# Altium PCB K210-01-(B049) 3C1A-140W(SD3934+SD59D31+SD59D31+SP1232FL) 外挂FTF屏1.3寸-V3-协议板.PcbDoc (part 2 of 2)
Units mm, origin at the board's own origin, x right, y up, seen from the top; angles counter-clockwise.
Board outline 62.01 x 27.28 mm, 4 copper layers (Top Layer, Mid-Layer 1, Mid-Layer 2, Bottom Layer); 105 components, 215 nets, 394 pads, 722 vias.
Unrouted connection lines stored in the file: 2.
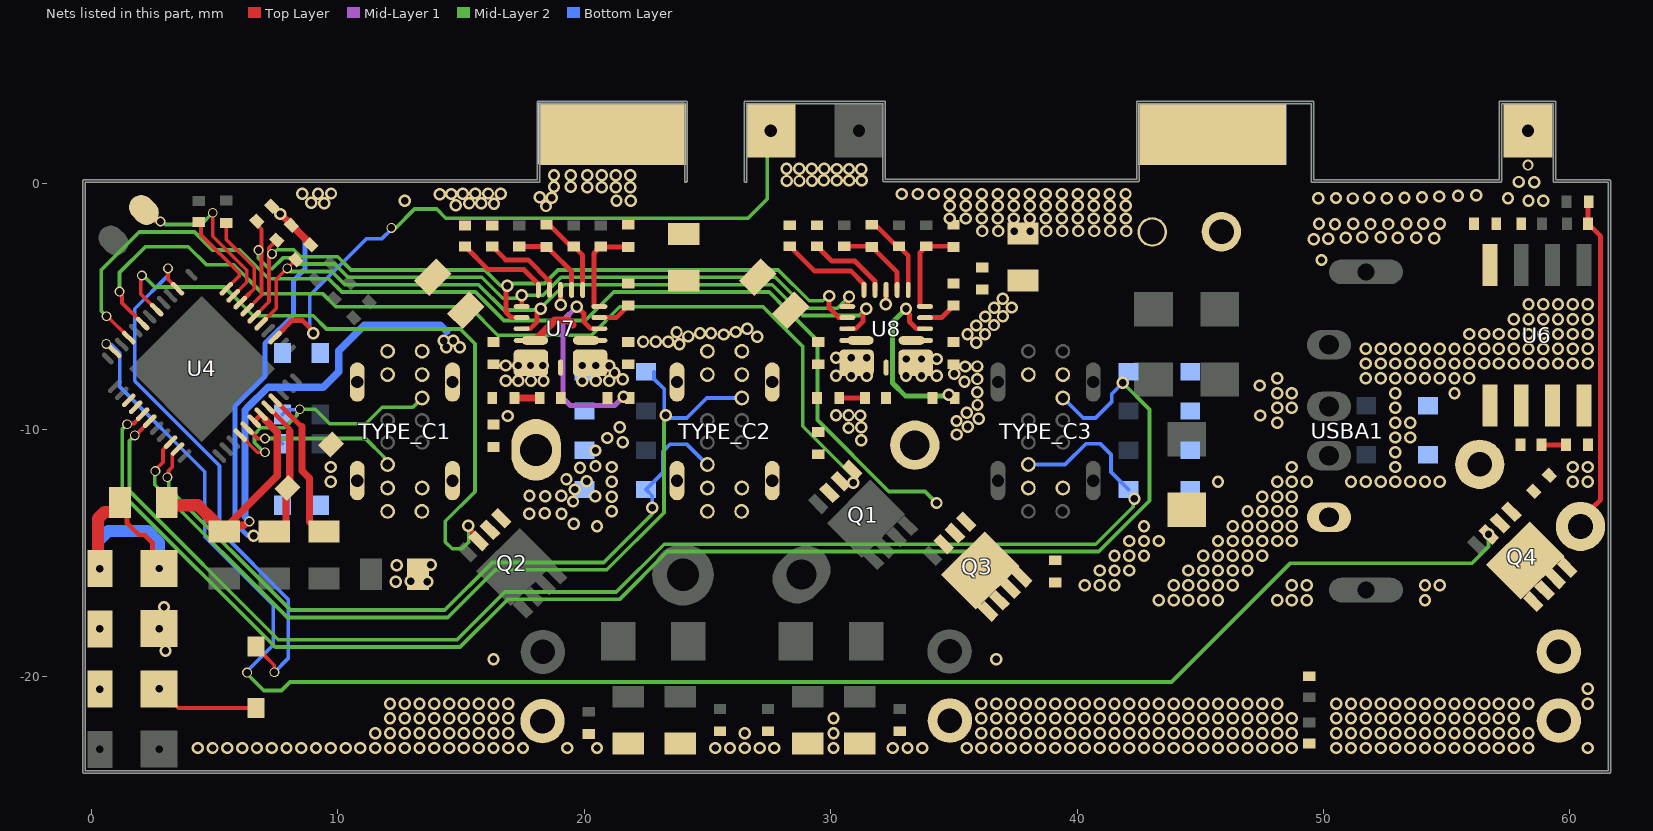
[diagram p4: the nets of this part, all layers, seen from the top]

## Via types
v1: diameter 0.5, hole 0.3, Top Layer to Bottom Layer, tented both sides, 681 vias
v2: diameter 0.4, hole 0.3, Top Layer to Bottom Layer, tented both sides, 40 vias
v3: diameter 0.45, hole 0.3, Top Layer to Bottom Layer, tented both sides, 1 vias

## Nets (pads, with @x,y where several pads share a name; then routed paths per layer and width w, separated by ;. In a path a pad name is that pad's centre, name@x,y a point inside that pad or via, vN(x,y) a via of type N, cw(c..) or ccw(c..) an arc to the next point about the centre after c; other vN are vias at no path point) (continued)
GND: C6.1 C7.1 C11.1 C17.1 C24.1 C25.1 C26.2 C55.2 C72.1 C73.1 C74.1 C75.1 C76.1 C77.2 C78.1 C79.1 C80.1 C81.2 C82.1 C83.1 C84.1 C85.1 C86.1 C87.1 C88.1 C89.1 C92.2 C93.2 C94.2 C95.2 C116.2 C117.1 C118.1 ESD2.1 ESD4.1 ESD5.1 ESD6.1 ESD7.1 ESD8.1 ESD9.1 ESD10.1 ESD11.1 ESD12.1 ESD13.1 ESD14.1 ESD15.1 ESD16.1 ESD17.1 JUMP2.2 pad.2@0.35,-18.086 pad.2@2.75,-18.08 pad.2@58.3,2.132 pad.GND@21.15,1.982 pad.GND@45.475,1.982 R1.2 R5.2 R21.2 R22.1 R24.2 R55.2 R56.2 TYPE_C1. TYPE_C1.A1 TYPE_C1.A12 TYPE_C1.B1 TYPE_C1.B12 TYPE_C2. TYPE_C2.A1 TYPE_C2.A12 TYPE_C2.B1 TYPE_C2.B12 U6.7 U6.8 U7.5 U7.7 U7.14 U8.5 U8.7 U8.14 | length 1.2
  Top Layer w0.2: U7.14@19.04,-4.332 19.04,-4.92 v1(19.05,-4.93) ; v1(32.24,-4.92) 32.252,-4.908 U8.14@32.252,-4.332
  other v1: 4.32,-22.92 4.92,-22.92 5.52,-22.92 6.12,-22.92 6.72,-22.92 7.32,-22.92 7.92,-22.92 8.52,-22.92 9.12,-22.92 9.72,-22.92 10.32,-22.92 10.92,-22.92 11.52,-22.92 12.12,-22.92 12.72,-22.92 13.32,-22.92 13.92,-22.92 14.52,-22.92 15.12,-22.92 15.72,-22.92 16.32,-22.92 16.92,-22.92 17.52,-22.92 19.32,-22.92 20.52,-22.92 25.32,-22.92 25.92,-22.92 26.52,-22.92 27.12,-22.92 27.72,-22.92 30.12,-22.92 32.52,-22.92 33.12,-22.92 33.72,-22.92 35.52,-22.92 36.12,-22.92 36.72,-22.92 37.32,-22.92 37.92,-22.92 38.52,-22.92 39.12,-22.92 39.72,-22.92 40.32,-22.92 40.92,-22.92 41.52,-22.92 42.12,-22.92 42.72,-22.92 43.32,-22.92 43.92,-22.92 44.52,-22.92 45.12,-22.92 45.72,-22.92 46.32,-22.92 46.92,-22.92 47.52,-22.92 48.12,-22.92 48.72,-22.92 50.52,-22.92 51.12,-22.92 51.72,-22.92 52.32,-22.92 52.92,-22.92 53.52,-22.92 54.12,-22.92 54.72,-22.92 55.32,-22.92 55.92,-22.92 56.52,-22.92 57.12,-22.92 57.72,-22.92 58.32,-22.92 60.72,-22.92 11.52,-22.32 12.12,-22.32 12.72,-22.32 13.32,-22.32 13.92,-22.32 14.52,-22.32 15.12,-22.32 15.72,-22.32 16.32,-22.32 16.92,-22.32 26.52,-22.32 30.12,-22.32 36.12,-22.32 36.72,-22.32 37.32,-22.32 37.92,-22.32 38.52,-22.32 39.12,-22.32 39.72,-22.32 40.32,-22.32 40.92,-22.32 41.52,-22.32 42.12,-22.32 42.72,-22.32 43.32,-22.32 43.92,-22.32 44.52,-22.32 45.12,-22.32 45.72,-22.32 46.32,-22.32 46.92,-22.32 47.52,-22.32 48.12,-22.32 48.72,-22.32 50.52,-22.32 51.12,-22.32 51.72,-22.32 52.32,-22.32 52.92,-22.32 53.52,-22.32 54.12,-22.32 54.72,-22.32 55.32,-22.32 55.92,-22.32 56.52,-22.32 57.12,-22.32 57.72,-22.32 58.32,-22.32 12.12,-21.72 12.72,-21.72 13.32,-21.72 13.92,-21.72 14.52,-21.72 15.12,-21.72 15.72,-21.72 16.32,-21.72 16.92,-21.72 30.12,-21.72 36.12,-21.72 36.72,-21.72 37.32,-21.72 37.92,-21.72 38.52,-21.72 39.12,-21.72 39.72,-21.72 40.32,-21.72 40.92,-21.72 41.52,-21.72 42.12,-21.72 42.72,-21.72 43.32,-21.72 43.92,-21.72 44.52,-21.72 45.12,-21.72 45.72,-21.72 46.32,-21.72 46.92,-21.72 47.52,-21.72 48.12,-21.72 48.72,-21.72 50.52,-21.72 51.12,-21.72 51.72,-21.72 52.32,-21.72 52.92,-21.72 53.52,-21.72 54.12,-21.72 54.72,-21.72 55.32,-21.72 55.92,-21.72 56.52,-21.72 57.12,-21.72 57.72,-21.72 12.12,-21.12 12.72,-21.12 13.32,-21.12 13.92,-21.12 14.52,-21.12 15.12,-21.12 15.72,-21.12 16.32,-21.12 16.92,-21.12 36.12,-21.12 36.72,-21.12 37.32,-21.12 37.92,-21.12 38.52,-21.12 39.12,-21.12 39.72,-21.12 40.32,-21.12 40.92,-21.12 41.52,-21.12 42.12,-21.12 42.72,-21.12 43.32,-21.12 43.92,-21.12 44.52,-21.12 45.12,-21.12 45.72,-21.12 46.32,-21.12 46.92,-21.12 47.52,-21.12 48.12,-21.12 50.52,-21.12 51.12,-21.12 51.72,-21.12 52.32,-21.12 52.92,-21.12 53.52,-21.12 54.12,-21.12 54.72,-21.12 55.32,-21.12 55.92,-21.12 56.52,-21.12 57.12,-21.12 57.72,-21.12 58.32,-21.12 60.72,-21.12 60.72,-20.52 16.32,-19.32 36.72,-19.32 3.01,-18.97 2.95,-17.2 43.32,-16.92 43.92,-16.92 44.52,-16.92 45.12,-16.92 45.72,-16.92 48.12,-16.92 48.72,-16.92 49.32,-16.92 54.12,-16.92 40.32,-16.32 40.92,-16.32 41.52,-16.32 43.92,-16.32 44.52,-16.32 45.12,-16.32 45.72,-16.32 46.32,-16.32 48.72,-16.32 49.32,-16.32 54.12,-16.32 54.72,-16.32 13.63,-16.18 12.36,-16.17 12.96,-16.15 40.92,-15.72 41.52,-15.72 42.12,-15.72 44.52,-15.72 45.12,-15.72 45.72,-15.72 46.32,-15.72 46.92,-15.72 12.39,-15.51 13.78,-15.49 41.52,-15.12 42.12,-15.12 42.72,-15.12 45.12,-15.12 45.72,-15.12 46.32,-15.12 46.92,-15.12 47.52,-15.12 42.12,-14.52 42.72,-14.52 43.32,-14.52 45.72,-14.52 46.32,-14.52 46.92,-14.52 47.52,-14.52 48.12,-14.52 48.72,-14.52 20.52,-13.92 42.72,-13.92 46.32,-13.92 46.92,-13.92 47.52,-13.92 48.12,-13.92 48.72,-13.92 19.58,-13.82 17.77,-13.41 19.08,-13.41 18.4,-13.39 21.12,-13.32 46.92,-13.32 47.52,-13.32 48.12,-13.32 48.72,-13.32 19.55,-12.92 21.12,-12.72 47.52,-12.72 48.12,-12.72 48.72,-12.72 18.42,-12.7 20.45,-12.71 17.78,-12.68 19.07,-12.69 19.62,-12.43 9.72,-12.12 21.12,-12.12 45.72,-12.12 48.12,-12.12 48.72,-12.12 49.32,-12.12 51.12,-12.12 51.72,-12.12 52.32,-12.12 52.92,-12.12 53.52,-12.12 54.12,-12.12 54.72,-12.12 60.12,-12.12 60.72,-12.12 20.1,-12.09 19.28,-12.01 19.83,-11.55 9.72,-11.52 21.12,-11.52 48.72,-11.52 52.92,-11.52 60.12,-11.52 60.72,-11.52 20.46,-11.48 52.92,-10.92 20.46,-10.85 21.57,-10.52 31.24,-10.43 20.94,-10.34 52.92,-10.32 53.52,-10.32 35.12,-10.2 30.73,-9.935 21.44,-9.91 31.24,-9.91 35.57,-9.88 48.12,-9.72 52.92,-9.72 53.52,-9.72 35.11,-9.65 36.01,-9.56 16.9,-9.45 30.22,-9.418 30.73,-9.42 31.21,-9.43 47.43,-9.43 35.53,-9.32 48.12,-9.12 48.72,-9.12 52.92,-9.12 35.96,-9 48.12,-8.52 48.72,-8.52 52.92,-8.52 55.32,-8.52 35.945,-8.48 47.42,-8.21 35.434,-8.062 19.92,-8.03 20.47,-8.02 16.82,-8.018 17.33,-8.018 17.84,-8.018 18.35,-8.018 21.02,-8.018 21.56,-7.958 35.945,-7.95 48.12,-7.92 51.72,-7.92 52.32,-7.92 52.92,-7.92 53.52,-7.92 54.12,-7.92 54.72,-7.92 55.32,-7.92 55.92,-7.92 30.22,-7.82 30.845,-7.82 31.47,-7.82 33.06,-7.82 33.688,-7.82 34.313,-7.82 35.02,-7.73 21.23,-7.7 35.46,-7.44 35.946,-7.437 16.82,-7.4 17.32,-7.4 17.82,-7.4 18.32,-7.4 19.92,-7.4 20.47,-7.4 21.02,-7.402 51.72,-7.32 52.32,-7.32 52.92,-7.32 53.52,-7.32 54.12,-7.32 54.72,-7.32 55.32,-7.32 55.92,-7.32 56.52,-7.32 57.12,-7.32 57.72,-7.32 58.32,-7.32 58.92,-7.32 59.52,-7.32 60.12,-7.32 60.72,-7.32 33.063,-7.134 33.688,-7.134 34.313,-7.134 30.22,-7.08 30.845,-7.08 31.47,-7.08 51.72,-6.72 52.32,-6.72 52.92,-6.72 53.52,-6.72 54.12,-6.72 54.72,-6.72 55.32,-6.72 55.92,-6.72 56.52,-6.72 57.12,-6.72 57.72,-6.72 58.32,-6.72 58.92,-6.72 59.52,-6.72 60.12,-6.72 60.72,-6.72 55.92,-6.12 56.52,-6.12 57.12,-6.12 57.72,-6.12 58.32,-6.12 58.92,-6.12 59.52,-6.12 60.12,-6.12 60.72,-6.12 57.72,-5.52 58.32,-5.52 58.92,-5.52 59.52,-5.52 60.12,-5.52 60.72,-5.52 58.32,-4.92 58.92,-4.92 59.52,-4.92 60.12,-4.92 60.72,-4.92 49.92,-3.12 49.6,-2.28 50.19,-2.25 54.49,-2.23 50.91,-2.21 53.02,-2.21 53.76,-2.22 51.57,-2.19 52.32,-2.19 36.158,-1.945 36.807,-1.945 37.456,-1.945 38.104,-1.945 38.753,-1.945 39.401,-1.945 40.05,-1.945 40.698,-1.945 41.347,-1.945 41.996,-1.945 50.47,-1.67 49.82,-1.65 51.21,-1.65 51.91,-1.66 52.63,-1.66 53.37,-1.65 54.05,-1.65 54.72,-1.65 34.839,-1.434 35.488,-1.434 36.137,-1.434 36.785,-1.434 37.434,-1.434 38.082,-1.434 38.731,-1.434 39.379,-1.434 40.028,-1.434 40.677,-1.434 41.325,-1.434 41.974,-1.434 18.45,-0.93 34.837,-0.921 35.485,-0.921 36.134,-0.921 36.782,-0.921 37.431,-0.921 38.079,-0.921 38.728,-0.921 39.377,-0.921 40.025,-0.921 40.674,-0.921 41.322,-0.921 41.971,-0.921 14.79,-0.89 9.455,-0.811 15.33,-0.82 15.83,-0.82 16.34,-0.83 8.92,-0.8 12.72,-0.72 21.313,-0.72 21.896,-0.72 58.32,-0.72 58.92,-0.72 49.79,-0.61 51.19,-0.62 52.57,-0.61 57.49,-0.61 18.69,-0.59 50.51,-0.6 51.86,-0.59 53.29,-0.59 18.203,-0.571 54,-0.57 54.7,-0.54 55.46,-0.51 56.2,-0.49 8.564,-0.43 9.2,-0.43 14.14,-0.45 14.61,-0.44 15.07,-0.43 16.62,-0.43 32.89,-0.44 33.539,-0.44 34.187,-0.44 34.836,-0.44 35.484,-0.44 36.133,-0.44 36.781,-0.44 37.43,-0.44 38.079,-0.44 38.727,-0.44 39.376,-0.44 40.024,-0.44 40.673,-0.44 41.321,-0.44 41.97,-0.44 9.73,-0.42 15.58,-0.42 16.1,-0.42 19.453,-0.151 20.13,-0.16 20.712,-0.16 21.284,-0.16 21.867,-0.16 18.776,-0.145 57.93,0.05 58.55,0.04 28.216,0.091 28.736,0.091 29.246,0.091 29.724,0.118 30.25,0.11 30.76,0.11 31.27,0.11 18.776,0.32 19.453,0.32 20.13,0.32 20.712,0.32 21.284,0.32 21.867,0.32 31.24,0.56 28.21,0.582 28.73,0.59 29.24,0.59 29.74,0.59 30.245,0.577 30.745,0.577
  other v3: 58.3,0.732
GND_C1: 
GND_C2: 
GND_C4: 
HG1: 
HG2: 
I2C_SCL: D1.1 pad.2@0.35,-20.53 pad.2@2.75,-20.524 | length 4.3
  Top Layer w0.15: pad.2@2.75,-20.524 3.526,-21.3 D1.1@6.68,-21.3
I2C_SDA: 
IFB1: 
IFB2: 
IFB3: 
IFB3-1: 
IIC_SCL: R3.2 U4.6 U7.3 U8.3 | length 31
  Top Layer w0.15: U4.6@6.892,-5.699 7.509,-5.082 7.509,-3.898 v2(7.95,-3.457) 8.299,-3.108 R3.2@8.302,-3.108
  Top Layer w0.2: U7.3@17.465,-5.907 17.806,-5.907 18.09,-5.623 18.09,-5.292 v1@18.09,-5.138 ; U8.3@30.677,-5.907 31.018,-5.907 31.32,-5.605 31.32,-5.305 31.445,-5.181 v1(31.445,-5.1)
  Mid-Layer 2 w0.15: v2(7.95,-3.457) 8.075,-3.582 9.754,-3.582 10.293,-4.12 15.716,-4.12 16.746,-5.15 18.182,-5.15 v1(18.232,-5.1) 18.232,-5.076 19.188,-4.12 27.631,-4.12 28.318,-4.808 28.881,-5.37 31.174,-5.37 v1(31.445,-5.1)
IIC_SDA: R4.2 U4.7 U7.2 U8.2 | length 30.9
  Top Layer w0.15: U4.7@6.609,-5.416 7.209,-4.816 v2@7.209,-2.871 ; v2(7.334,-2.871) v2@7.209,-2.871 ; R4.2@7.522,-2.308 7.209,-2.621 v2@7.209,-2.871
  Top Layer w0.2: v1(16.881,-4.165) 16.881,-4.247 16.82,-4.308 16.82,-5.23 17.047,-5.457 U7.2@17.465,-5.457 ; v1(29.94,-4.58) 29.94,-5.061 30.287,-5.407 ; 30.317,-5.457 U8.2@30.677,-5.457
  Mid-Layer 2 w0.15: v2(7.334,-2.871) 7.376,-2.871 7.547,-2.7 8.218,-2.7 8.5,-2.982 10.003,-2.982 10.541,-3.52 15.964,-3.52 16.61,-4.165 v1(16.881,-4.165) 16.977,-4.07 18.39,-4.07 18.94,-3.52 27.879,-3.52 29.129,-4.77 29.677,-4.77 29.867,-4.58 v1(29.94,-4.58)
LCD_CLK: 
LCD_CS: 
LCD_DC: 
LCD_EN2: 
LCD_MOSI: 
LCD_RES: 
LCD_TE: 
LEDA: 
LG1: 
LG2: 
NetC2_1: 
NetC2_2: 
NetC4_2: 
NetC8_2: C8.2 U4.49 | length 5.8
  Top Layer w0.2: U4.49@7.457,-8.811 8.216,-9.569 8.55,-9.903
  Top Layer w0.3: 8.55,-9.888 8.55,-9.903 8.55,-11.672 8.853,-11.975 8.853,-13.743 C8.2@9.055,-13.945
NetC12_2: 
NetC13_2: 
NetC15_2: 
NetC24_2: C24.2 R18.2 | length 1
  Top Layer w0.2: R18.2@58.85,-10.62 C24.2@59.84,-10.62
NetC26_2: 
NetC67_2: 
NetC72_2: C72.2 R49.2 | length 1
  Top Layer w0.3: C72.2@17.167,-8.718 R49.2@18.198,-8.718
NetC73_2: C73.2 R50.2 | length 1.1
  Top Layer w0.2: C73.2@30.35,-8.718 R50.2@31.4,-8.718
NetC90_1: C90.1 U7.9 | length 8.1
  Top Layer w0.2: v1(19.694,-5.02) 19.719,-5.02 19.99,-5.291 19.99,-5.623 20.274,-5.907 U7.9@20.615,-5.907
  Mid-Layer 1 w0.2: v1(19.694,-5.02) 19.14,-5.574 19.14,-8.73 19.43,-9.02 21.242,-9.02 v1(21.598,-8.665)
NetC91_1: C91.1 U8.9 | length 7.1
  Top Layer w0.2: 33.202,-5.323 33.202,-5.623 33.487,-5.907 U8.9@33.827,-5.907 ; v1(34.79,-8.58) 34.928,-8.718 C91.1@35.04,-8.718
  Mid-Layer 2 w0.2: v1(33.06,-5.1) 32.51,-5.65 32.51,-8.11 33.03,-8.63 34.74,-8.63 v1(34.79,-8.58)
NetC94_1: C94.1 R51.2 U7.11 | length 3.9
  Top Layer w0.2: U7.11@20.615,-5.007 20.398,-5.007 20.398,-2.845 20.527,-2.715 20.527,-2.665 20.627,-2.565 R51.2@20.677,-2.565 20.702,-2.59 C94.1@21.788,-2.59
NetC95_1: C95.1 R52.2 U8.11 | length 3.9
  Top Layer w0.2: U8.11@33.827,-5.007 33.632,-5.007 33.632,-2.81 33.732,-2.71 33.732,-2.66 33.832,-2.56 34.965,-2.56 C95.1@34.99,-2.585
NetC96_1: C96.1 R57.2 U7.13 | length 3.3
  Top Layer w0.2: R57.2@17.369,-2.565 18.497,-2.565 18.622,-2.69 18.622,-2.715 19.49,-3.583 U7.13@19.49,-4.332
NetC96_2: C96.2 R53.2 U7.12 | length 3.4
  Top Layer w0.2: C96.2@18.472,-1.69 18.58,-1.69 19.455,-2.565 R53.2@19.575,-2.565 19.94,-2.93 U7.12@19.94,-4.332
NetC97_1: C97.1 R58.2 U8.13 | length 3.3
  Top Layer w0.2: R58.2@30.557,-2.56 31.64,-2.56 C97.1@31.665,-2.585 32.702,-3.622 U8.13@32.702,-4.332
NetC97_2: C97.2 R54.2 U8.12 | length 3.4
  Top Layer w0.2: C97.2@31.665,-1.685 31.815,-1.685 32.69,-2.56 R54.2@32.773,-2.56 33.152,-2.939 U8.12@33.152,-4.332
NetL2_1: L2.1 R18.1 U6.5 U6.6
NetQ5_G: 
NetQ6_G: 
NetR1_1: R1.1 U8.15 | length 3.3
  Top Layer w0.2: R1.1@29.448,-2.56 30.048,-3.16 30.986,-3.16 31.802,-3.977 U8.15@31.802,-4.332
NetR5_1: R5.1 U7.15 | length 3.3
  Top Layer w0.2: R5.1@16.267,-2.565 16.812,-3.11 17.726,-3.11 18.59,-3.974 U7.15@18.59,-4.332
NetR7_1: 
NetR8_1: 
NetR11_2: 
NetR19_2: R19.2 U4.11 | length 3.6
  Top Layer w0.15: R19.2@4.36,-1.58 4.449,-1.669 4.449,-2.099 6.009,-3.659 6.009,-3.753 U4.11@5.477,-4.285
NetR55_1: R55.1 U7.16 | length 3.8
  Top Layer w0.2: R55.1@15.164,-2.565 16.109,-3.51 17.56,-3.51 18.14,-4.09 U7.16@18.14,-4.332
NetR56_1: R56.1 U8.16 | length 3.9
  Top Layer w0.2: R56.1@28.34,-2.56 29.34,-3.56 30.82,-3.56 31.352,-4.092 U8.16@31.352,-4.332
NetR76_1: 
NetR77_1: 
NetRT1_1: RT1.1 U4.10 | length 7
  Top Layer w0.15: RT1.1@2.214,-1.176 2.593,-1.555 v2(2.807,-1.555) ; v2(4.93,-1.2) 4.93,-2.156 6.309,-3.535 6.309,-4.019 U4.10@5.76,-4.568
  Mid-Layer 2 w0.15: 2.999,-1.68 4.45,-1.68 v2(4.93,-1.2)
NetU2_14: 
NetU4_46: 
NTC1: 
NTC1-1: 
OPTO1: 
OPTO2: 
OPTO3: 
P0_CC1: ESD12.2 TYPE_C1.A5 U4.45 | length 7.5
  Top Layer w0.15: U4.45@6.326,-9.942 6.745,-10.361 v2(7.05,-10.361)
  Mid-Layer 2 w0.15: v2(7.05,-10.361) 11.123,-10.361 11.882,-11.12 ; TYPE_C1.A5@12.025,-11.42 TYPE_C1.A5@12.025,-11.298 ; 11.882,-11.12 12.025,-11.262 TYPE_C1.A5@12.025,-11.298 ; 11.882,-11.12 11.882,-11.156 TYPE_C1.A5@12.025,-11.298
  Bottom Layer w0.15: v2(7.05,-10.361) 7.059,-10.351 7.541,-10.351 ESD12.2@7.76,-10.57 ; TYPE_C1.A5@12.012,-11.42 TYPE_C1.A5@12.025,-11.42
P0_CC2: ESD13.2 TYPE_C1.B5 U4.44 | length 11.1
  Top Layer w0.15: U4.44@6.043,-10.225 6.738,-10.92 v2(7.05,-10.92)
  Mid-Layer 2 w0.15: v2(7.05,-10.92) 7.008,-10.92 6.625,-10.537 6.625,-10.185 6.88,-9.93 7.835,-9.93 8.35,-9.415 8.35,-9.351 8.41,-9.29 8.41,-9.22 8.365,-9.175 9.086,-9.175 9.672,-9.761 11.139,-9.761 11.805,-9.095 13.05,-9.095 TYPE_C1.B5@13.425,-8.72
  Bottom Layer w0.15: ESD13.2@7.76,-9.39 7.96,-9.19 8.443,-9.19 v2(8.458,-9.175)
P1_CC1: ESD7.2 TYPE_C2.A5 U4.37 | length 30.3
  Top Layer w0.15: v2(3.089,-11.936) 3.133,-11.892 3.133,-11.679 3.279,-11.533 3.279,-11.023 3.497,-10.804 U4.37@3.497,-10.79
  Mid-Layer 2 w0.15: v2(3.089,-11.936) 3.136,-11.984 3.136,-12.377 8.085,-17.325 14.344,-17.325 16.279,-15.39 20.796,-15.39 22.765,-13.421 v1(22.765,-13.173)
  Bottom Layer w0.15: v1(22.765,-13.173) 22.765,-12.685 ESD7.2@22.51,-12.43 23.195,-11.745 23.195,-10.885 23.49,-10.59 24.157,-10.59 24.987,-11.42 TYPE_C2.A5@25,-11.42
P1_CC2: ESD8.2 TYPE_C2.B5 U4.36 | length 35.8
  Top Layer w0.15: v2(2.599,-11.685) 2.599,-11.632 2.908,-11.324 2.908,-10.815 U4.36@3.215,-10.508
  Mid-Layer 2 w0.15: v2(2.599,-11.685) 2.57,-11.714 2.57,-12.234 7.961,-17.625 14.468,-17.625 16.403,-15.69 20.92,-15.69 23.24,-13.37 23.24,-9.678
  Bottom Layer w0.15: ESD8.2@22.835,-7.65 22.835,-7.945 23.245,-8.355 23.245,-9.348 v1(23.312,-9.415) ; v1@23.323,-9.403 23.45,-9.53 24.166,-9.53 24.976,-8.72 TYPE_C2.B5@26.4,-8.72
P2_CC1: ESD6.2 TYPE_C3.A5 U4.33 | length 54.6
  Top Layer w0.15: v2(1.76,-10.237) 1.788,-10.237 U4.33@2.366,-9.659
  Mid-Layer 2 w0.15: v2(1.76,-10.237) 1.76,-10.24 1.55,-10.45 1.55,-12.487 7.588,-18.525 14.841,-18.525 16.776,-16.59 21.306,-16.59 23.246,-14.65 40.759,-14.65 42.279,-13.13 42.279,-12.861 v1(42.33,-12.81)
  Bottom Layer w0.15: TYPE_C3.A5@38.025,-11.42 39.512,-11.42 40.352,-10.58 40.95,-10.58 41.38,-11.01 41.38,-11.72 ESD6.2@42.09,-12.43
P2_CC2: ESD2.2 TYPE_C3.B5 U4.32 | length 59.2
  Top Layer w0.15: v2(1.453,-9.781) 1.479,-9.755 1.727,-9.755 1.887,-9.595 1.887,-9.586 2.083,-9.39 U4.32@2.083,-9.376
  Mid-Layer 2 w0.15: v2(1.453,-9.781) 1.453,-9.792 1.25,-9.994 1.25,-12.611 7.464,-18.825 14.965,-18.825 16.9,-16.89 21.43,-16.89 23.37,-14.95 40.883,-14.95 42.587,-13.247 42.945,-12.888 42.945,-9.185 v1(41.86,-8.1)
  Bottom Layer w0.15: TYPE_C3.B5@39.425,-8.72 39.438,-8.72 40.248,-9.53 40.749,-9.53 41.415,-8.864 41.415,-8.545 v1(41.86,-8.1)
P3_CC1: U4.31
P3_CC2: U4.30
PB7: 
PB8: 
PD14: D1.2 U4.16 | length 22.1
  Top Layer w0.15: v2(3.113,-3.46) 3.113,-3.901 U4.16@3.497,-4.285 ; D1.2@6.68,-18.8 6.68,-18.85 6.955,-19.125 6.985,-19.125 7.419,-19.559 7.419,-19.839 v2(7.43,-19.85)
  Bottom Layer w0.15: v2(3.113,-3.46) 3.113,-3.747 1.76,-5.1 1.76,-8.024 5.2,-11.464 5.2,-14.094 7.986,-16.881 7.986,-19.294 v2(7.43,-19.85)
PF3: 
PFC: pad.2@27.575,2.132 U4.4 | length 27.1
  Top Layer w0.2: U4.4@7.457,-6.265 8.152,-5.57 8.566,-5.57 9.009,-6.013 v1(9.009,-6.09)
  Mid-Layer 2 w0.15: v2(12.174,-1.815) 12.351,-1.815 13.116,-1.05 14.014,-1.05 14.384,-1.42 26.646,-1.42 27.435,-0.631 27.435,1.992 pad.2@27.575,2.132
  Bottom Layer w0.15: v1(9.009,-6.09) 9.009,-5.995 8.86,-5.846 8.86,-4.57 9.009,-4.421 11.18,-2.25 11.8,-2.25 12.174,-1.876 v2(12.174,-1.815)
PFC1: 
PFC-FB: 
PLUG1: 
PLUG2: 
PLUG2-1: 
QB1: 
QB2: 
QE1: 
QE2: 
RESET: C12.2 U4.9 | length 3.9
  Top Layer w0.15: C12.2@5.47,-1.61 5.47,-2.271 6.609,-3.411 6.609,-4.285 6.382,-4.511
  Top Layer w0.2: U4.9@6.043,-4.851 6.382,-4.511
RST: 
RX: 
SD59D31_INT: R2.2 U4.8 U7.1 U8.1 | length 31.3
  Top Layer w0.15: U4.8@6.326,-5.134 6.909,-4.55 v2@6.909,-2.719 ; R2.2@6.722,-1.538 6.722,-1.682 6.909,-1.869 v2@6.909,-2.719 ; v2(6.784,-2.719) v2@6.909,-2.719
  Top Layer w0.2: U7.1@17.465,-5.007 17.466,-4.55 v1(17.467,-4.55) ; U8.1@30.677,-5.007 30.677,-4.683 v1(30.75,-4.61)
  Mid-Layer 2 w0.15: v2(6.784,-2.719) 6.784,-3.046 7.21,-3.472 7.334,-3.472 7.774,-3.032 8.126,-3.032 8.376,-3.282 9.879,-3.282 10.417,-3.82 15.84,-3.82 16.695,-4.675 17.247,-4.675 17.372,-4.55 18.334,-4.55 19.064,-3.82 27.755,-3.82 28.442,-4.508 ; 28.442,-4.508 29.005,-5.07 30.29,-5.07 v1(30.75,-4.61)
SW1: C90.2 L5.2 R49.1 U7.6
SW1-1: 
SW2: C91.2 L6.1 R50.1 U8.6
SW2-1: 
SW3: 
SW3-1: 
SWCLK: 
SWDIO: 
TX: 
VBUS1: C11.2 Q2.S TYPE_C1.A4 TYPE_C1.A9 TYPE_C1.B4 TYPE_C1.B9 U4.19 | length 27.5
  Top Layer w0.15: v2(2.053,-3.747) 2.01,-3.789 2.01,-4.495 U4.19@2.649,-5.134
  Top Layer w0.2: v1(15.3,-13.9) 15.3,-13.981 15.715,-14.396 Q2.S@15.715,-14.519
  Mid-Layer 2 w0.15: v2(2.053,-3.747) 2.106,-3.747 2.574,-4.215 5.407,-4.215 6.574,-5.382 9.009,-5.382 9.547,-5.92 14.97,-5.92 15.568,-6.517 15.568,-12.518 14.366,-13.72 14.366,-14.562 14.644,-14.84 15.038,-14.84 15.316,-14.562 15.316,-13.916 v1(15.3,-13.9)
VBUS2: C6.2 Q1.S TYPE_C2.A4 TYPE_C2.A9 TYPE_C2.B4 TYPE_C2.B9 U4.21 | length 39.4
  Top Layer w0.15: v2@1.248,-4.571 1.248,-4.865 U4.21@2.083,-5.699
  Mid-Layer 2 w0.15: v2(1.146,-4.401) 1.146,-3.628 2.194,-2.58 3.938,-2.58 4.672,-3.315 5.78,-3.315 6.947,-4.482 9.382,-4.482 9.92,-5.02 15.343,-5.02 16.497,-6.175 20.293,-6.175 21.447,-5.02 27.258,-5.02 27.945,-5.708 28.87,-6.632 28.87,-9.869 30.917,-11.916 v1(30.917,-12.163)
VBUS3: C7.2 Q3.S TYPE_C3.A4 TYPE_C3.A9 TYPE_C3.B4 TYPE_C3.B9 U4.23 | length 45.3
  Top Layer w0.15: v2(0.615,-5.398) 0.651,-5.398 U4.23@1.518,-6.265
  Top Layer w0.2: v1(34.3,-12.98) 34.31,-12.97 v1@34.41,-12.97
  Mid-Layer 2 w0.15: v2(0.615,-5.398) 0.611,-5.398 0.398,-5.185 0.398,-3.527 1.945,-1.98 4.186,-1.98 4.921,-2.715 6.028,-2.715 7.195,-3.882 9.63,-3.882 10.168,-4.42 15.591,-4.42 16.746,-5.575 20.044,-5.575 21.199,-4.42 27.506,-4.42 28.194,-5.108 29.47,-6.384 29.47,-9.616 32.364,-12.51 33.83,-12.51 v1(34.3,-12.98)
VBUS4: C17.2 Q4.S U4.25 USBA1.1 | length 70.8
  Top Layer w0.15: v2(0.606,-6.52) 0.628,-6.52 0.938,-6.831 U4.25@0.952,-6.831
  Mid-Layer 2 w0.15: v2@6.32,-19.84 v2(6.32,-19.86) 6.32,-19.911 6.994,-20.585 7.72,-20.585 8.065,-20.24 43.83,-20.24 48.64,-15.43 56.018,-15.43 56.659,-14.789 56.7,-14.748 v1(56.7,-14.24)
  Bottom Layer w0.15: v2(0.606,-6.52) 0.654,-6.568 0.831,-6.568 1.16,-6.897 1.16,-8.273 4.6,-11.713 4.6,-14.343 7.386,-17.129 7.386,-18.743 6.32,-19.809 v2(6.32,-19.86)
VBUS_C1: 
VBUS_C2: 
VBUS_C3: 
VBUS_C4: 
VCC5V: 
VCC_1: C92.1 U7.10 | length 1.4
  Top Layer w0.2: U7.10@20.615,-5.457 21.299,-5.457 C92.1@21.788,-4.969
VCC_2: C93.1 U8.10 | length 1.4
  Top Layer w0.2: U8.10@33.827,-5.457 34.502,-5.457 C93.1@34.99,-4.969
VCC_3: 
VDD: 
VDD5: C1.2 ESD11.2 R2.1 R3.1 R4.1 U4.48 | length 24
  Top Layer w0.2: U4.48@7.174,-9.093 8.05,-9.969 8.05,-10.067
  Top Layer w0.3: v1(6.585,-14.305) 7.255,-14.305 C1.2@7.42,-14.14 7.605,-14.14 7.9,-13.846 7.9,-12.723 7.965,-12.657 ESD11.2@7.965,-12.375 7.965,-12.092 8.05,-12.007 8.05,-10.067 ; R2.1@7.323,-0.937 7.34,-0.937 7.653,-1.25 v1(7.67,-1.25) 7.679,-1.25 8.124,-1.695 R4.1@8.135,-1.695 ; R4.1@8.123,-1.707 8.191,-1.776 8.196,-1.776 8.903,-2.483 R3.1@8.903,-2.507
  Bottom Layer w0.2: v1(6.585,-14.305) 6.352,-14.305 5.825,-13.778 5.825,-9.059 7.05,-7.834 7.05,-6.496 8.209,-5.338 8.209,-3.94 8.669,-3.479 8.669,-2.249 v1(7.67,-1.25)
VFB1: 
VFB2: 
VFB3: 
VFB3-1: 
VIN: C3.2 C25.2 C55.1 C84.2 C85.2 C86.2 C87.2 C88.2 C89.2 C116.1 C117.2 C118.2 pad.GND@21.08,2.02 pad.GND@45.51,1.99 R10.2 U4.46 U4.47 U6.4 U7.4 U7.8 U8.4 U8.8 | length 27.5
  Top Layer w0.2: U4.46@6.609,-9.659 U4.47@6.892,-9.376 ; v1(14.408,-6.657) 14.422,-6.657 14.678,-6.4 v1(14.692,-6.4)
  Top Layer w0.3: C3.2@5.199,-14.14 5.281,-14.14 7.55,-11.871 7.55,-10.105 U4.47@7.051,-9.607 ; C3.2@5.39,-14.14 5.648,-13.882 6.191,-13.882 6.324,-13.749 6.394,-13.749 v2(6.413,-13.73) ; C84.2@15.2,-5.16 C84.2@15.305,-5.16 ; U7.4@17.998,-6.382 18.702,-5.679 18.702,-5.675 18.807,-5.57 19.36,-5.57 19.54,-5.75
  Top Layer w0.5: R10.2@3.06,-12.96 3.06,-13.07 4.32,-13.07 5.005,-13.755 5.005,-13.945 C3.2@5.199,-14.14
  Mid-Layer 1 w0.3: v1@22.36,-6.46 v1(22.39,-6.43)
  Bottom Layer w0.3: v2(6.413,-13.73) 6.413,-13.703 6.237,-13.527 6.237,-9.213 6.37,-9.08 7.17,-8.28 9.41,-8.28 10.04,-7.65 10.04,-6.8 11.07,-5.77 14.17,-5.77 14.42,-6.02
  other v1: 14.95,-6.658 23.87,-6.54 35.912,-6.481 22.9,-6.44 23.41,-6.44 14.303,-6.4 24.23,-6.22 27.03,-6.23 25.66,-6.14 35.555,-6.132 36.265,-6.127 24.7,-6.09 25.146,-6.084 23.75,-6.05 26.15,-6.04 26.62,-5.91 35.908,-5.778 36.633,-5.759 36.276,-5.41 36.993,-5.399 36.637,-5.05 37.347,-5.045 36.99,-4.696
VIN+: pad.2@0.35,-15.643 pad.2@2.75,-15.636 R10.1 | length 11.5
  Top Layer w0.2: R10.1@1.11,-13.07 1.454,-13.415 1.454,-13.794 1.928,-14.268 2.153,-14.268 2.475,-14.591 2.475,-15.065 pad.2@2.48,-15.07
  Top Layer w0.5: pad.2@0.35,-15.643 0.275,-15.643 0.275,-13.605 0.535,-13.345 0.965,-13.345 1.16,-13.151 R10.1@1.16,-12.96 ; pad.2@2.625,-15.511 pad.2@2.75,-15.636
  Mid-Layer 2 w0.5: pad.2@0.24,-15.25 0.328,-15.162 pad.2@0.275,-15.162
  Bottom Layer w0.5: pad.2@0.35,-15.643 0.275,-15.568 0.275,-14.528 0.685,-14.118 2.278,-14.118 2.75,-14.59 pad.2@2.75,-15.636
VIN-1: 
VIN-2: 
VIN_1: 
VIN_2: 
VIN_3: 
VIN_3V: 
VOUT4: C26.1 C27.1 L2.2 Q3.D Q4.D R20.2 R23.1 | length 12.8
  Top Layer w0.2: C27.1@60.765,-0.75 60.74,-0.775 R20.2@60.74,-1.643 61.25,-2.153 61.25,-12.84 L2.2@60.928,-13.162
pads on no net: U4.1 U4.12 U4.13 U4.15 U4.17 U4.26 U4.27 U4.39 U4.40 U4.52 U6.2 USBA1.

## Polygon pours and split planes (outlines as drawn)
GND on Top Layer "GND_L01_P092" (solid, remove dead copper, pour order 92): -9.58,18.43 -14.85,13.16 -14.85,-32.05 66.83,-32.05 68.23,-33.45 72.76,-28.92 72.76,8.85 -11.3,8.85 -15.61,13.16
VIN on Top Layer "VIN_L01_P078" (solid, remove dead copper, pour order 78): 2.278,-11.239 2.69,-11.651 2.69,-14.75 7.74,-14.75 7.88,-14.89 7.962,-14.808 7.962,-8.75 5.54,-8.75 5.33,-8.54
CSN on Top Layer "CSN_L01_P077" (solid, remove dead copper, pour order 77): 9.58,-1.45 6.7,-4.33 6.7,-4.62 6.617,-4.703 6.617,-6.112 7.464,-6.112 8.336,-6.983 8.937,-6.382 10.165,-6.382 10.165,-2.282 10.461,-1.985
AGND on Top Layer "AGND_L01_P076" (solid, remove dead copper, pour order 76): 11.43,-5.715 13.131,-4.014 13.131,-2.145 12.006,-1.02 8.71,-1.02 7.58,0.11 -0.46,0.11 -0.32,-0.03 -0.32,-12.3 1.61,-12.3 1.72,-12.41 1.72,-16.53 1.94,-16.75 11.87,-16.75 11.88,-16.74 11.88,-14.8 11.63,-14.55 8.04,-14.55 8.04,-9.46 7.73,-9.15 11.164,-5.715
VIN+ on Top Layer "VIN+_L01_P075" (solid, remove dead copper, pour order 75): -0.32,-12.3 -0.32,-16.65 -0.18,-16.79 3.64,-16.79 3.57,-16.72 3.57,-14.69 3.51,-14.63 2.42,-14.63 1.45,-13.66 1.45,-12.33 1.48,-12.3
D31_CSP1 on Top Layer "D31_CSP1_L01_P001" (solid, remove dead copper, pour order 1): 23.52,-14.18 22.54,-15.16 22.54,-18.2 22.73,-18.39 22.73,-21.75 25.89,-21.75 26.23,-21.41 26.23,-15.95 24.46,-14.18
VIN on Top Layer "VIN_L01_P031" (solid, remove dead copper, pour order 31): 45.25,-1.16 43.63,-2.78 37.78,-2.78 36.63,-3.93 35.91,-3.93 35.57,-4.27 35.57,-4.87 35.34,-5.1 29.26,-5.1 28.51,-4.35 27.67,-5.19 27.22,-5.19 25.5,-3.47 23.3,-3.47 21.82,-4.95 15.98,-4.95 15.38,-4.35 15.24,-4.35 13.67,-5.92 13.67,-6.64 14.07,-7.04 36.38,-7.04 39.04,-4.38 48.15,-4.38 49.59,-5.82 55.2,-5.82 57.06,-3.96 57.06,-1.81 56.33,-1.08 55.89,-1.08 52.93,-4.04 50.18,-4.04 47.3,-1.16 46.36,-1.16
VBUS4 on Top Layer "VBUS4_L01_P022" (solid, remove dead copper, pour order 22): 58.51,-12.08 59.13,-12.7 59.13,-13.03 59.01,-13.03 56.79,-15.25 49.73,-15.25 49.24,-14.76 49.24,-13.18 49.65,-12.77 57.76,-12.77 58.45,-12.08
CSP3 on Top Layer "CSP3_L01_P018" (solid, remove dead copper, pour order 18): 44.39,-4.38 44.39,-7.02 48.06,-7.02 49.17,-8.13 50.42,-8.13 51.16,-7.39 51.16,-6.17 50.81,-5.82 49.59,-5.82 48.15,-4.38
CSN on Top Layer "CSN_L01_P017" (solid, remove dead copper, pour order 17): 41.43,-7.28 41.43,-11.04 41.53,-11.14 46.95,-11.14 47.11,-10.98 47.11,-7.28
CSP2 on Top Layer "CSP2_L01_P015" (solid, remove dead copper, pour order 15): 44.32,-4.39 39.03,-4.39 36.5,-6.92 36.5,-14.09 37.99,-15.58 39.94,-15.58 41.41,-14.11 41.41,-7.06 44.32,-7.06
VBUS3 on Top Layer "VBUS3_L01_P014" (solid, remove dead copper, pour order 14): 33.344,-13.296 34.72,-11.92 34.72,-11.35 37.17,-8.9 37.17,-7.69 37.55,-7.31 39.87,-7.31 40.12,-7.56 40.12,-14.96 39.5,-15.58 37.99,-15.58 36.44,-14.03 36.01,-14.03 34.28,-15.76 33.786,-15.266 33.61,-15.266 33.344,-15
SW2 on Top Layer "SW2_L01_P013" (solid, remove dead copper, pour order 13): 31.64,-6.036 31.64,-11.88 33.2,-13.44 34.72,-11.92 34.72,-8.76 34.45,-8.49 33.21,-8.49 32.77,-8.05 32.77,-6.059 32.631,-5.92
VBUS2 on Top Layer "VBUS2_L01_P012" (solid, remove dead copper, pour order 12): 26.72,-6.89 24.15,-6.89 23.68,-7.36 23.68,-13.4 26.152,-15.872 26.418,-15.872 27.73,-14.56 28.97,-14.56 31.56,-11.97 31.69,-11.97 30.19,-10.47 29.16,-10.47 29.03,-10.34 29.03,-9.61 26.34,-6.92 26.17,-6.92
NetL2_1 on Top Layer "NETL2_1_L01_P010" (solid, remove dead copper, pour order 10): 58.36,-7.8 56.71,-7.8 55.23,-9.28 55.23,-11.54 55.72,-12.03 57.23,-12.03 58.4,-10.86 58.4,-7.86 58.32,-7.78
VOUT4 on Top Layer "VOUT4_L01_P008" (solid, remove dead copper, pour order 8): 34.26,-15.8 38.76,-20.3 59.83,-20.3 61.51,-18.62 61.51,-13.21 60.88,-12.58 59.49,-12.58 54.49,-17.58 39.59,-17.58 36.07,-14.06 36.07,-14.03 36.01,-14.03 34.28,-15.76
SW1 on Top Layer "SW1_L01_P006" (solid, remove dead copper, pour order 6): 18.64,-5.87 18.64,-8.57 17.01,-10.2 17.01,-11.667 17.461,-12.118 18.432,-12.118 21.32,-9.23 21.32,-8.55 21.2,-8.43 20.05,-8.43 19.42,-7.8 19.42,-6.16 19.48,-6.1
VBUS1 on Top Layer "VBUS1_L01_P005" (solid, remove dead copper, pour order 5): 10.61,-6.17 10.61,-14.85 14.44,-14.85 15.41,-15.82 17.26,-13.97 17.26,-10.81 12.62,-6.17
D31_VOUT2 on Top Layer "D31_VOUT2_L01_P004" (solid, remove dead copper, pour order 4): 31.69,-11.97 29.44,-14.22 30.28,-15.06 30.28,-21.27 30.7,-21.69 33.54,-21.69 35.79,-19.44 35.79,-18.46 33.61,-16.28 33.61,-14.51 33.61,-13.85 31.83,-12.07
D31_CSP2 on Top Layer "D31_CSP2_L01_P002" (solid, remove dead copper, pour order 2): 29.33,-14.2 27.98,-14.2 26.23,-15.95 26.23,-21.41 26.53,-21.71 29.49,-21.71 30.08,-21.12 30.08,-16.62 30.08,-14.95
D31_VOUT1 on Top Layer "D31_VOUT1_L01_P000" (solid, remove dead copper, pour order 0): 17.26,-13.97 15.41,-15.82 15.41,-17.67 19.46,-21.72 22.68,-21.72 22.68,-18.29 18.36,-13.97 17.38,-13.97
GND on Bottom Layer "GND_L04_P094" (solid, remove dead copper, pour order 94): -1.2,15.19 -1.2,-22.86 -5.26,-26.92 -4.42,-27.76 66.33,-27.76 66.33,12.66
PD14 on Bottom Layer "PD14_L04_P082" (solid, remove dead copper, pour order 82): 2.11,-2.83 2.11,-3.01 0.22,-4.9 0.22,-7.633 1.147,-8.56 2.32,-8.56 2.32,-4.731 3.939,-3.112
AGND on Bottom Layer "AGND_L04_P080" (solid, remove dead copper, pour order 80): 5.81,-14.41 10.94,-14.41 11.11,-14.58 11.11,-21.94 10.96,-22.09 -1.25,-22.09 -1.6,-21.74 -1.09,-21.23 -1.09,2.24 7.83,2.24 9.61,0.46 9.61,-5.233 6.089,-8.755 6.089,-14.041
P2_CC1 on Bottom Layer "P2_CC1_L04_P051" (solid, remove dead copper, pour order 51): 39.39,-9.57 38.85,-9.57 37.8,-10.62 37.8,-11.67 41.34,-11.67 42.19,-12.52 42.44,-12.27 42.44,-9.48
VIN on Bottom Layer "VIN_L04_P032" (solid, remove dead copper, pour order 32): 18.11,3.53 18.11,0.65 18.1,0.64 20.68,0.64 21.06,0.26 21.06,-4.427 20.298,-5.189 14.731,-5.189 14.05,-5.87 14.05,-6.66 14.41,-7.02 44.46,-7.02 48.97,-2.51 48.97,3.36 18.5,3.36 18.27,3.59
VIN on Mid-Layer 1 "VIN_L02_P095" (solid, remove dead copper, pour order 95): 22.2,-5.14 27.07,-5.14 27.8,-5.87 27.73,-5.94 27.73,-6.49 27.17,-7.05 21.78,-7.05 21.78,-5.39 21.89,-5.28
GND on Mid-Layer 1 "GND_L02_P093" (solid, remove dead copper, pour order 93): -10.52,10.97 -16.74,4.75 -16.74,-33.35 68.23,-33.35 69.61,-34.73 70.41,-33.93 70.41,13.28
VIN on Mid-Layer 1 "VIN_L02_P070" (solid, remove dead copper, pour order 70): 13.765,-5.85 13.708,-5.907 13.708,-7.346 15.426,-7.346 15.59,-7.51 15.59,-5.93
FB on Mid-Layer 2 "FB_L03_P096" (solid, remove dead copper, pour order 96): 11.38,-1.21 11.31,-1.28 11.31,-3.07 15.36,-3.07 15.33,-3.04 15.33,-0.82
IIC_SDA on Mid-Layer 2 "IIC_SDA_L03_P090" (solid, remove dead copper, pour order 90): 28.128,-3.345 28.194,-3.41 28.194,-5.108 30.912,-5.108 31.174,-5.37 31.26,-5.284 31.26,-3.91
P2_CC2 on Mid-Layer 2 "P2_CC2_L03_P089" (solid, remove dead copper, pour order 89): 41.53,-9.239 41.53,-13.879 40.859,-14.55 43.59,-14.55 43.59,-9.28 43.76,-9.11
P0_CC2 on Mid-Layer 2 "P0_CC2_L03_P088" (solid, remove dead copper, pour order 88): 6.44,-8.41 6.444,-8.414 6.444,-11.85 14.34,-11.85 14.63,-11.56 14.52,-11.45 14.52,-7.87
GND on Mid-Layer 2 "GND_L03_P087" (solid, remove dead copper, pour order 87): -2.32,12.88 -10.95,4.25 -10.95,-31.45 68.76,-31.45 71.82,-34.51 72.47,-33.86 72.47,16.26
IIC_SCL on Mid-Layer 2 "IIC_SCL_L03_P086" (solid, remove dead copper, pour order 86): 16.03,-4.16 16.03,-5.487 15.957,-5.56 18.79,-5.56 18.79,-4.518 19.188,-4.12
IIC_SDA on Mid-Layer 2 "IIC_SDA_L03_P085" (solid, remove dead copper, pour order 85): 15.75,-3.17 15.591,-3.329 15.591,-4.42 18.87,-4.42 18.97,-4.52 19.74,-3.75 19.74,-3.01
SD59D31_INT on Mid-Layer 2 "SD59D31_INT_L03_P084" (solid, remove dead copper, pour order 84): 6.13,-2.08 6.13,-3.665 6.655,-4.19 8.94,-4.19 8.94,-2.6 8.64,-2.3
G1 on Mid-Layer 2 "G1_L03_P083" (solid, remove dead copper, pour order 83): 1.64,-4.362 1.718,-4.44 4.72,-4.44 4.72,-2.781 5.016,-2.485 4.951,-2.42 1.63,-2.42
AGND on Mid-Layer 2 "AGND_L03_P081" (solid, remove dead copper, pour order 81): -0.41,1.34 -0.41,-12.74 -0.47,-12.8 3.7,-12.8 8.08,-17.18 11.03,-17.18 11.03,-15.21 6.69,-10.87 6.69,-5.807 8.05,-4.447 8.05,0.13 0.12,0.13 0.04,0.21

## Keep-outs
Top Layer:
  lines w0.01: 14.655,-9.091 14.655,-9.615 15.378,-10.338 16.9,-10.338 ; 27.63,-8.863 27.63,-9.53 28.735,-10.635 30.34,-10.635
Keep-Out Layer:
  circle w0.1: c18.104,0.122 r0.2
  circle w0.1: c24.154,0.132 r0.2
  circle w0.1: c26.5,0.12 r0.2
  circle w0.1: c32.21,0.14 r0.2
  circle w0.1: c1.925,-14.818 r0.2
  circle w0.1: c0.975,-14.818 r0.2
  circle w0.1: c42.425,0.157 r0.2
  circle w0.1: c59.425,0.132 r0.2
  circle w0.1: c49.6,0.132 r0.2
  circle w0.1: c57.125,0.132 r0.2
  lines w0.1: -0.306,-22.382 -0.306,-15.199 ; -0.3,-23.893 -0.3,0.082 18.15,0.082 18.15,3.282 24.125,3.282 24.125,0.082 26.55,0.082 26.55,3.282 32.175,3.282 32.175,0.107 42.475,0.107 42.475,3.282 49.55,3.282 49.55,0.082 57.175,0.082 57.175,3.282 59.375,3.282 59.375,0.082 61.6,0.082 61.6,-23.893 -0.3,-23.893 ; 0.925,-23.893 1.975,-23.893 1.975,-14.768 0.925,-14.768 0.925,-23.893
  text "四层板   FR-4   1OZ   1mm厚" at 63.744,-22.825 h0.8 r90

## Other copper
Top Layer:
  rectangle net FB: 29.59,1.04 32.16,3.24
  rectangle net PFC: 26.55,1.04 29.18,3.24
  rectangle net I2C_SCL: 1.96,-21.51 3.72,-19.65
  rectangle net VIN+: 1.94,-16.75 3.58,-14.81
  pour cut-out: 45.28,-5.76 45.28,-7.29 45.3,-7.31 46.46,-7.31 46.47,-7.3 46.47,-5.83 46.49,-5.81 45.35,-5.81 45.32,-5.78
  pour cut-out: 42.57,-5.78 42.57,-7.29 42.56,-7.3 43.62,-7.3 43.64,-7.28 43.64,-5.85 43.66,-5.83 42.64,-5.83 42.58,-5.77
  pour cut-out: 22.02,-17.98 23.55,-17.98 23.57,-18 23.57,-19.04 23.6,-19.07 22.09,-19.07 22.08,-19.06 22.08,-18.02 22.05,-17.99
  pour cut-out: 30.81,-18.14 30.82,-18.13 30.83,-18.14 30.83,-19.18 29.35,-19.18 29.32,-19.15 29.32,-18.14
Bottom Layer:
  rectangle net GND: 41.971,-2.99 43.99,-0.921
  rectangle net FB: 29.48,1.04 32.16,3.23
  rectangle net PFC: 26.57,1.06 29.15,3.23
  rectangle net VIN+: 1.99,-16.62 3.56,-14.66

## Silkscreen, mask and mechanical layers (free items; w line width, h text height)
Top Overlay:
  text "FB" at 30.25,0.11 h1.5
  text "GND" at 21.69,-0.137 h1.2
  text "GND" at 57.14,-0.127 h1.2
  text "GND" at 44.57,-0.397 h1.2
  text "PFC" at 26.128,-1.968 h1.5 r45
Bottom Overlay:
  text "VIN+" at 46.729,-0.44 h1.2
  text "VIN+" at 23.758,-0.701 h1.2
  text "VIN+" at 6.8,-16.12 h1.52
  text "GND" at 6.92,-18.41 h1.52
  text "TX" at 6.36,-20.98 h1.52
Bottom Solder:
  rectangle: -0.1,-23.893 0.925,-22.28
  rectangle: -0.15,-21.27 0.84,-19.79
  rectangle: -0.12,-18.84 0.87,-17.32
  rectangle: -0.1,-16.39 0.86,-14.98
  rectangle: 2.07,-16.31 3.57,-14.96
  rectangle: 2.01,-18.88 3.57,-17.28
  rectangle: 2.01,-21.31 3.51,-19.78
  rectangle: 1.96,-23.78 3.55,-22.25
  rectangle: 42.59,0.81 49.31,3.28
  rectangle: 18.09,0.82 24.16,3.29